# Altium PCB resistive.PcbDoc
Units mm, origin at the board's own origin, x right, y up, seen from the top; angles counter-clockwise.
Board outline 18 x 14 mm, 2 copper layers (Top Layer, Bottom Layer); 29 components, 21 nets, 74 pads, 21 vias.
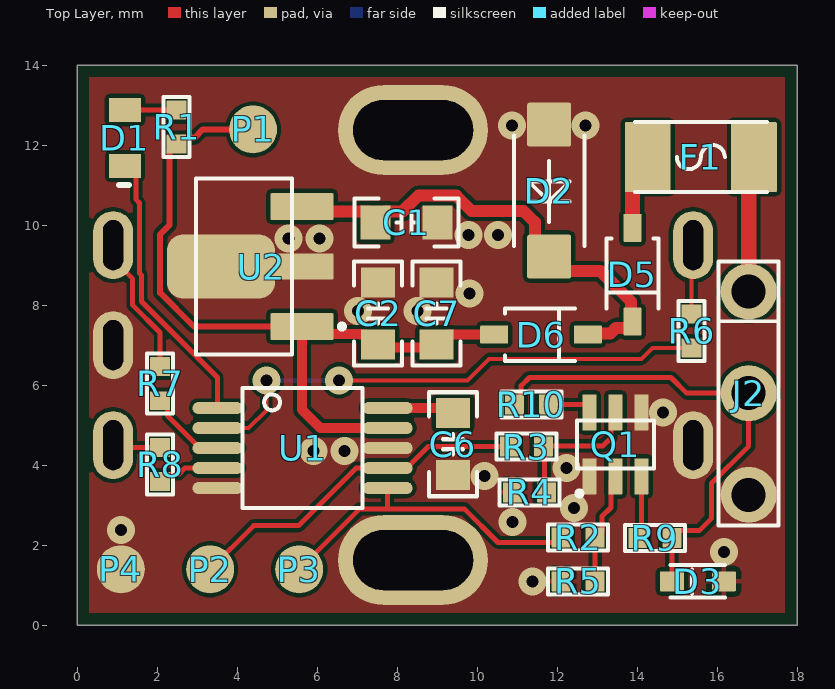
[diagram p0: Top Layer view]
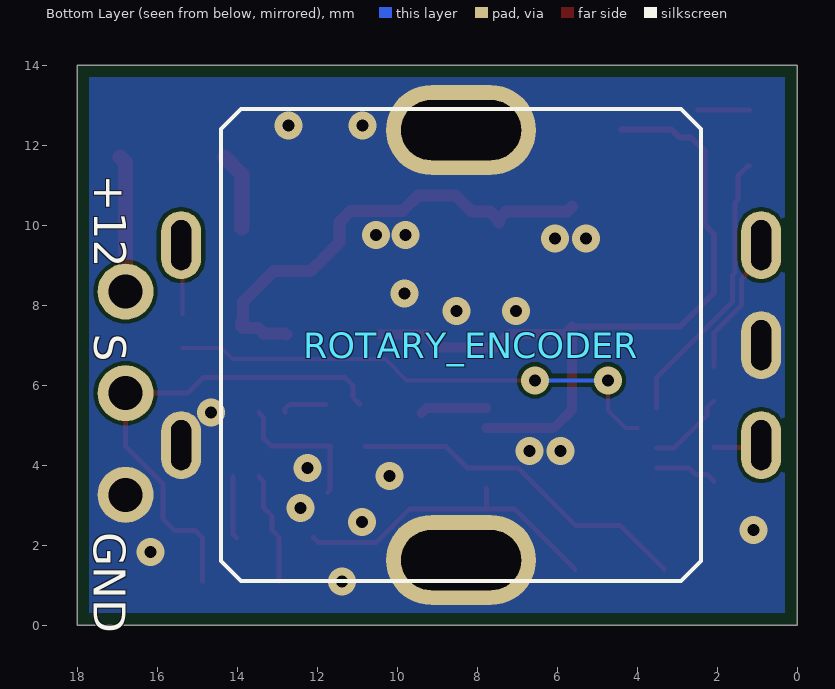
[diagram p1: Bottom Layer view, seen from below]
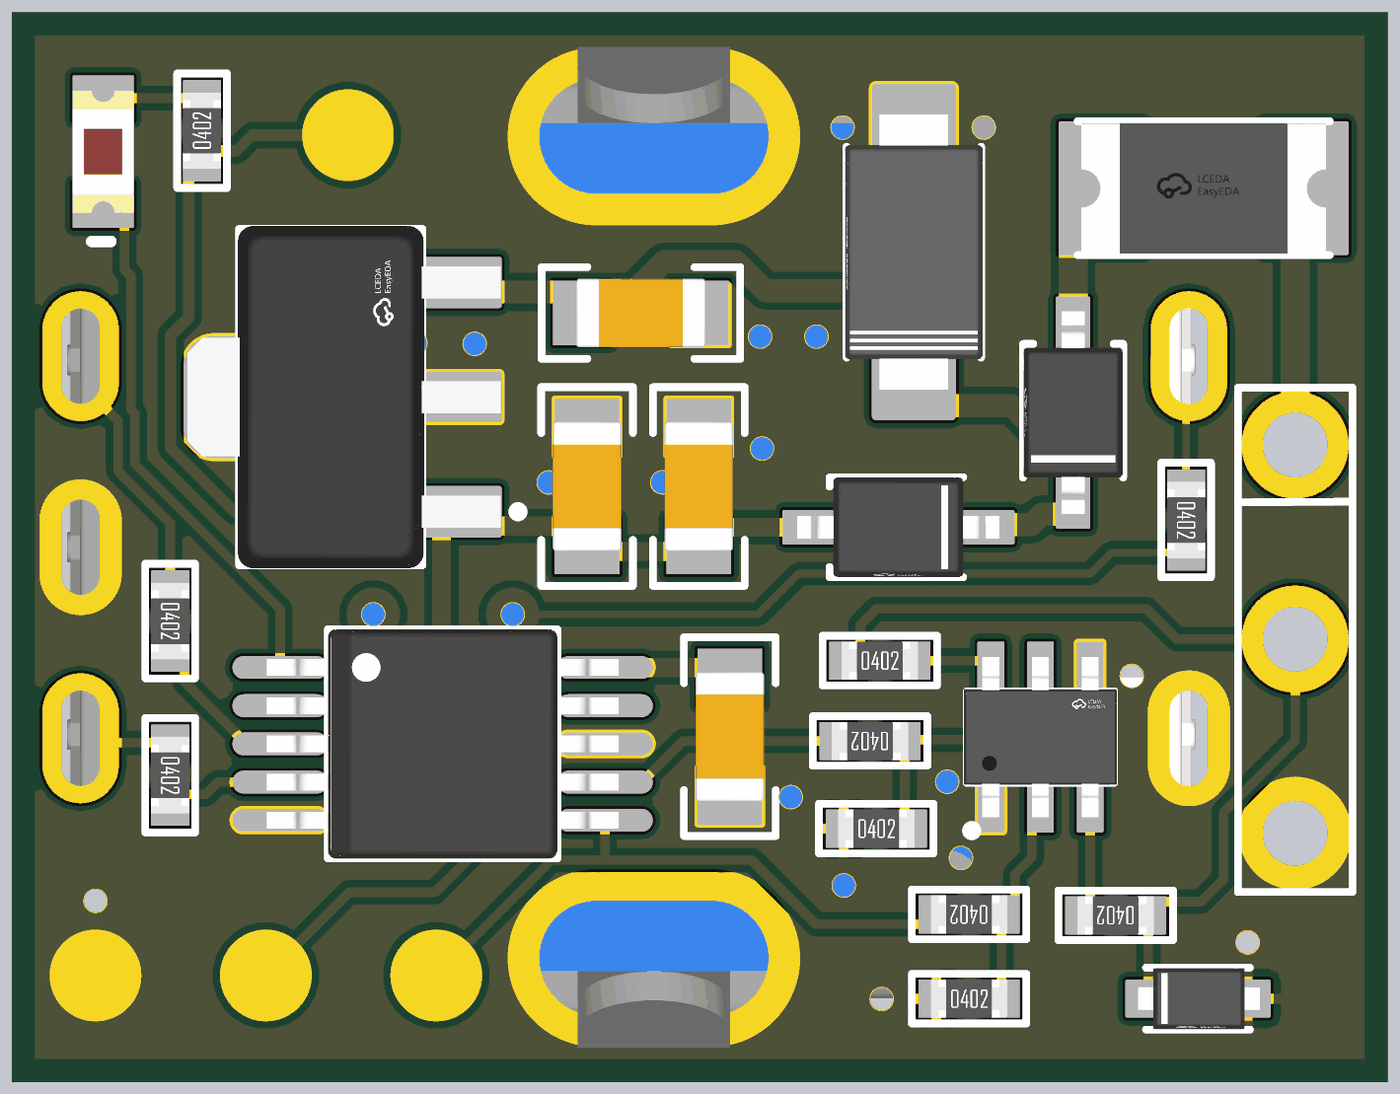
[diagram p2: 3D render of the assembled board from above, using the file's embedded part models]

## Layer stack, top to bottom
Top Solder: solder mask 0.0102, Solder Resist, Dk 3.5
Top Layer: signal copper 0.0356
Dielectric 1: dielectric 0.32, FR-4, Dk 4.8
Bottom Layer: signal copper 0.0356
Bottom Solder: solder mask 0.0102, Solder Resist, Dk 3.5

## Board outline
0,0 0,14 18,14 18,0

## Design rules (kind name [scope] priority, off if disabled: settings)
BoardOutlineClearance [OnCopper] p1: gap=0.3 ignorepadtopadclearanceinfootprint=FALSE except(0: Arc-SplitContinuation Track-SplitContinuation SMDPad-SplitContinuation THPad-SplitContinuation Via-SplitContinuation Fill-SplitContinuation Poly-SplitContinuation Region-SplitContinuation Text-SplitContinuation)
Clearance [All] p1: gap=0.095 ignorepadtopadclearanceinfootprint=FALSE
ComponentClearance [Not OnLayer('Enclosure') vs Not OnLayer('Enclosure')] p1: gap=0.125 collisioncheckmode=3 verticalgap=0.254 showdistances=TRUE
DiffPairsRouting [InDifferentialPairClass('USB')] p1: maxlimit=0.127 minlimit=0.127 mostfreqgap=0.127 toplayer_minwidth=0.242 toplayer_maxwidth=0.242 toplayer_prefwidth=0.242 bottomlayer_minwidth=0.242 bottomlayer_maxwidth=0.242 bottomlayer_prefwidth=0.242 impedanceprofiledriven=TRUE impedanceprofileid={CD0D31D9-B0F9-43E5-BBF6-D407F49B71FA} maxuncoupledlength=14
HoleSize [All] p1: absolutevalues=TRUE maxlimit=5 minlimit=0.2 maxpercent=80.000 minpercent=20.000
MinimumSolderMaskSliver [All] p1: minsoldermaskwidth=0
NetAntennae [Not InComponentClass('KEYPAD')] p1: netantennaetolerance=0
PolygonConnect PolygonConnect_GND [All vs IsVia Or (IsPad And ((AsMM(PadXSize_AllLayers) * AsMM(PadYSize_AllLayers)) >= 0.31))] p1: connectstyle=Direct reliefconductorwidth=0.254 reliefentries=4 polygonreliefangle="90 Angle" airgapwidth=0.254
PolygonConnect PolygonConnect_Normal [All] p2: connectstyle=Relief reliefconductorwidth=0.127 reliefentries=4 polygonreliefangle="90 Angle" airgapwidth=0.127
RoutingVias [All] p1: holewidth=0.711 width=1.27 viastyle="Through Hole" minholewidth=0.711 minwidth=1.27 maxholewidth=0.711 maxwidth=1.27 useviatemplates=TRUE viatemplateguid#1={04ACC37B-7A8D-4E3D-BE00-B1F644DBFDDB} viatemplateguid#2={0474D94F-0ABB-4B82-A31C-A553258D154D} viatemplateguid#3={78088A16-755C-4FA5-86BD-2362A4E1C389} viatemplatename#1=GND_VIA viatemplatename#2=PWR_VIA viatemplatename#3=SIGNAL_VIA
SilkToSilkClearance [All] p1: silktosilkclearance=0
SilkToSolderMaskClearance [False] p1: minsilkscreentomaskgap=0 clearancetoexposedcopper=TRUE
SolderMaskExpansion SolderMaskExpansion_VIA [IsVia] p1: expansion=0.102 istentingtop=TRUE soldermaskfromhole=TRUE
SolderMaskExpansion [All] p2: expansion=0.038 istentingtop=FALSE
SupplyNets "Schematic Supply Nets_10" [InNet('12V')] p1: voltage=0.000
SupplyNets "Schematic Supply Nets_2" [InNet('5V')] p2: voltage=0.000
SupplyNets "Schematic Supply Nets" [InNet('3v3')] p3: voltage=0.000
SupplyNets "Schematic Supply Nets_4" [InNet('GND')] p4: voltage=0.000
Width Width_PWR_LOW [InNetClass('PWR_LOW')] p1: maxlimit=2 minlimit=0.089 preferedwidth=0.3 minimp=50.000000 maximp=50.000000 favimp=50.000000
Width Width_PWR_MED [InNetClass('PWR_MED')] p2: maxlimit=3 minlimit=0.089 preferedwidth=0.5 minimp=50.000000 maximp=50.000000 favimp=50.000000
Width Width_PWR_SW [InNetClass('PWR_SW')] p3: maxlimit=5 minlimit=0.25 preferedwidth=1 minimp=50.000000 maximp=50.000000 favimp=50.000000
Width Width_PWR_HIGH [InNetClass('PWR_HIGH')] p4: maxlimit=5 minlimit=0.089 preferedwidth=1.5 bottomlayer_prefwidth=1.5 minimp=50.000000 maximp=50.000000 favimp=50.000000
Width Width_default [All] p5: maxlimit=1 minlimit=0.089 preferedwidth=0.15 minimp=50.000000 maximp=50.000000 favimp=50.000000
23 further rules are at their usual default settings.

## Components (designator, comment, footprint, x,y, rotation, side; value= is the part's Value field where it differs from the comment)
C1 "1u" MLCC_0603 8.23,10.066 r180 top
C2 "100n" MLCC_0603 7.526,7.796 r270 top
C6 "1u" MLCC_0603 9.394,4.522 r90 top
C7 "10u" MLCC_0603 8.987,7.796 r270 top
D1 "Red" LED0603 1.195,12.176 r90 top
D2 "SMF18A" SOD-123FL 11.801,10.862 r90 top
D3 "PESD24VS1UB" SOD-523 15.518,1.094 r0 top
D5 "1N4148WS" SOD-323 13.884,8.761 r90 top
D6 "1N4148WS" SOD-323 11.598,7.262 r180 top
F1 "100mA" F1206 15.593,11.698 r0 top
J2 "CON_X3" CON_X3 16.79,8.338 r270 top
P1 "PAD" PAD 4.398,12.392 r0 top
P2 "PAD" PAD 3.324,1.397 r0 top
P3 "PAD" PAD 5.553,1.397 r0 top
P4 "PAD" PAD 1.095,1.397 r0 top
Q1 "2N7002DW" SOT-363 13.458,4.517 r0 top
R1 "1k" R0402 2.489,12.45 r90 top
R2 "22r" R0402 12.524,2.196 r180 top
R3 "22r" R0402 11.228,4.465 r180 top
R4 "47k" R0402 11.31,3.319 r0 top
R5 "47k" R0402 12.524,1.094 r0 top
R6 "220r" R0402 15.363,7.356 r270 top
R7 "220r" R0402 2.072,6.035 r270 top
R8 "220r" R0402 2.072,4.017 r270 top
R9 "1k" R0402 14.442,2.184 r180 top
R10 "1k5" R0402 11.355,5.517 r0 top
ROTARY_ENCODER "ROTARY_ENCODER" ENCODER 8.4,7 r90 bottom
U1 "CH554E" MSOP10 5.636,4.427 r270 top
U2 "78L05_SOT89" SOT-89-3 4.172,8.965 r0 top

## Footprints (in the part's own frame and the unit in brackets; to place one, negate y for a bottom-side part, rotate by r counter-clockwise, add the part's x,y. Pads: shape width x height; smd on the part's side, far side on the other; paste and mask are expansions set on the pad)
CON_X3 [mm]
  round 1.4 hole 0.85: 1(0,0) 2(2.54,0) 3(5.08,0)
  silkscreen extent -0.75,-0.75 5.85,0.75
ENCODER [mm] "Rotary encoder"
  oval 1.7x1 hole 0.5 slot 1.25 at 0 deg: 1(-2.5,-7.5) 2(0,-7.5) 3(2.5,-7.5) 4(-2.5,7) 5(2.5,7)
  rrect100% 2.25x3.75 hole 1.5 slot 3 at 90 deg: M(-5.375,0)
  oval 2.25x3.75 hole 1.5 slot 3 at 90 deg: M(5.375,0)
  silkscreen extent -5.9,-6 5.9,6, body extent -6.55,-7.68 6.55,7.08, height 21.18
F1206 [mm] "Littelfuse 468 series 1206 fuse"
  rrect5% 1.14x1.75 smd: 1(-1.33,0) 2(1.33,0)
  silkscreen extent -1.65,-0.87 1.65,0.87, body extent -1.6,-0.85 1.6,0.85, height 0.6
LED0603 [mm] "Chip LED 0603 (1608 metric), pad 1 cathode (left)"
  rrect5% 0.6x0.8 smd: A(0.7,0) K(-0.7,0)
  silkscreen extent -1.17,-0.1 -1.17,0.15, body extent -0.8,-0.4 0.8,0.4, height 0.28
MLCC_0603 [mm] "MLCC 0603"
  rrect1% 0.75x0.85 smd: 1(-0.775,0) 2(0.775,0)
  silkscreen extent -1.3,-0.6 1.3,0.6, body extent -0.85,-0.45 0.85,0.45, height 0.7
MSOP10 [mm] "MSOP10 3x3 x 0.5"
  oval 0.3x1.25 smd: 1(-1,-2.125) 2(-0.5,-2.125) 3(0,-2.125) 4(0.5,-2.125) 5(1,-2.125) 6(1,2.125) 7(0.5,2.125) 8(0,2.125) 9(-0.5,2.125) 10(-1,2.125)
  silkscreen extent -1.5,-1.5 1.5,1.5, body extent -1.5,-2.3 1.5,2.3, height 1
PAD [mm]
  round 1.2 smd paste-2539.97 mask+0: 1(0,0)
R0402 [mm] "Chip resistor 0402 (1005 metric)"
  rrect5% 0.473x0.5 smd: 1(-0.426,0) 2(0.426,0)
  silkscreen extent -0.75,-0.33 0.75,0.33, body extent -0.5,-0.25 0.5,0.25, height 0.35
SOD-123FL [mm] "SOD-123FL diode/TVS, pad 1 = cathode (left), pad 2 = anode"
  rrect10% 1.1x1.1 smd: A(1.65,0) K(-1.65,0)
  silkscreen extent -1.38,-0.88 1.38,0.88, body extent -1.8,-0.9 1.8,0.9, height 0.9
SOD-323 [mm] "SOD-323 diode, pads K (cathode, left) / A"
  rrect10% 0.7x0.45 smd: A(1.17,0) K(-1.17,0)
  silkscreen extent -0.85,-0.65 0.9,0.65, body extent -1.33,-0.65 1.33,0.65, height 0.95
SOD-523 [mm] "SOD-523 (SC-79) diode, pads K (cathode, left) / A"
  rrect10% 0.6x0.5 smd: A(0.65,0) K(-0.65,0)
  silkscreen extent -0.68,-0.4 0.68,0.4, body extent -0.79,-0.4 0.81,0.4, height 0.7
SOT-89-3 [mm] "SOT-89-3, 1=OUT 2=GND(tab) 3=IN for 78L05 C20628877"
  rrect10% 1.575x0.672 smd: 1(1.45,-1.5) 3(1.45,1.5)
  rrect50% 2.7x1.6 smd: 2(-0.575,0)
  rrect10% 1.575x0.66 smd: 2(1.45,0)
  silkscreen extent -1.2,-2.2 2.5,2.2, body extent -1.88,-2.24 2.22,2.24, height 1.5
SOT-363 [mm] "SOT-363 (SC-70-6), pin 1 bottom-left, 0.65mm pitch"
  rrect10% 0.35x0.9 smd: 1(-0.65,-0.8) 2(0,-0.8) 3(0.65,-0.8) 4(0.65,0.8) 5(0,0.8) 6(-0.65,0.8)
  silkscreen extent -0.97,-1.27 0.96,0.6, body extent -1,-1.05 1,1.05, height 0.95

## Part data
C1 C6: library part CAP_0603_1U_50V, "MLCC", JLCPCB=C15849
C2: library part CAP_0603_100N_50V, "MLCC", JLCPCB=C14663
C7: library part CAP_0603_10U_10V, "MLCC", JLCPCB=C19702
D1: library part LED_0603_RED, "LED", JLCPCB=C2286
D2: "TVS Diode", JLCPCB=C19077512
D3: "TVS Diode", JLCPCB=C85382
D5 D6: "Silicon Diode", JLCPCB=C2128
F1: library part PTC_1206_100MA, "FUSE", JLCPCB=C70065, Part=nSMD010
Q1: "Dual N-Channel MOSFET", JLCPCB=C5190214, Part=2N7002DW
R1 R9: library part RES_0402_1K, "Resistor", JLCPCB=C11702
R2 R3: library part RES_0402_22R, "Resistor", JLCPCB=C25092
R4 R5: library part RES_0402_47K, "Resistor", JLCPCB=C25792
R6 R7 R8: library part RES_0402_220R, "Resistor", JLCPCB=C25091
R10: library part RES_0402_1K5, "Resistor", JLCPCB=C25867
ROTARY_ENCODER: "Rotary Encoder"
U1: JLCPCB=C111293
U2: "5V LDO", JLCPCB=C20628877, Part=AS78L05RTR-E1

## Via types
v1: diameter 0.7, hole 0.3, Top Layer to Bottom Layer, tented both sides, 21 vias

## Nets (pads, with @x,y where several pads share a name; then routed paths per layer and width w, separated by ;. In a path a pad name is that pad's centre, name@x,y a point inside that pad or via, vN(x,y) a via of type N, cw(c..) or ccw(c..) an arc to the next point about the centre after c; other vN are vias at no path point)
3v3: C6.2 U1.10 | length 1.7
  Top Layer w0.25: U1.10 9.264,5.427 C6.2
5V: C2.2 C7.2 D6.A P1.1 R1.1 U1.9 U2.1 | length 19.4
  Top Layer w0.15: P1.1 3.142,12.392 2.936,12.186 2.65,12.186 R1.1 2.475,12.024 2.314,11.863 2.314,10.009 2.077,9.772 2.077,8.305 2.917,7.465 U2.1
  Top Layer w0.25: U1.9 6.08,4.927 5.622,5.385 U2.1 5.809,7.278 7.079,7.278 7.087,7.271 7.226,7.271 7.526,6.971 7.526,6.944 8.987,6.944 8.987,6.962 9.287,7.262 D6.A
12V: F1.2 J2.1 | length 3.7
  Top Layer w0.381: J2.1@16.79,8.084 16.79,11.565 F1.2
12V_F: D5.A F1.1 | length 1.9
  Top Layer w0.381: D5.A 13.884,11.269 F1.1@14.314,11.698
12V_S: C1.2 D2.K D5.K D6.K U2.3 | length 11.9
  Top Layer w0.3: U2.3 5.747,10.339 7.27,10.339 C1.2@7.455,10.155 ; C1.2 7.455,10.116 7.68,10.341 8.135,10.341 8.53,10.736 9.479,10.736 9.857,10.357 11.157,10.357 11.442,10.072 11.442,9.571 D2.K 12.161,8.852 13.084,8.852 13.85,8.086 13.85,7.626 D5.K 13.884,7.466 13.85,7.432 13.472,7.432 13.337,7.297 12.803,7.297 D6.K
BTN: R6.2 U1.2 | length 12.6
  Top Layer w0.1: U1.2@3.986,4.927 4.289,4.927 4.729,5.367 v1(4.729,6.121) ; v1(6.553,6.121) 9.764,6.121 10.296,6.654 14.111,6.654 14.387,6.93 R6.2
  Bottom Layer w0.1: v1(4.729,6.121) v1(6.553,6.121)
DA: Q1.6 R10.2 | length 1.2
  Top Layer w0.125: R10.2 12.695,5.517 12.808,5.404 Q1.6
DB: Q1.3 R9.2 | length 1.6
  Top Layer w0.125: R9.2 14.108,2.276 Q1.3
GA: Q1.2 R2.1 R5.2 | length 2.8
  Top Layer w0.125: R5.2 R2.1 13.124,2.37 13.124,2.72 13.345,2.941 13.345,3.604 Q1.2
GB: Q1.5 R3.1 R4.2 | length 3.6
  Top Layer w0.125: R4.2 11.681,3.373 11.681,4.438 R3.1 11.672,4.482 13.149,4.482 13.345,4.678 13.345,5.205 Q1.5
GND: C1.1 C2.1 C6.1 C7.1 D2.A D3.A J2.3 P4.1 Q1.1 Q1.4 R4.1 R5.1 ROTARY_ENCODER.2 ROTARY_ENCODER.4 ROTARY_ENCODER.M U1.5 U1.8 U2.2
  other v1: 11.38,1.088 16.168,1.83 1.095,2.373 10.884,2.575 12.417,2.934 10.19,3.731 12.238,3.932 6.687,4.348 5.913,4.357 14.652,5.317 7.025,7.848 8.511,7.85 9.815,8.291 5.28,9.671 6.055,9.661 9.789,9.756 10.527,9.756 10.869,12.491 12.716,12.491
LED: D1.K U1.1 | length 7
  Top Layer w0.125: D1.K 1.237,11.476 1.475,11.239 1.475,10.636 1.558,10.554 1.558,8.8 1.61,8.748 1.61,8.09 3.511,6.189 U1.1
LED_A: D1.A R1.2 | length 1.3
  Top Layer w0.125: D1.A R1.2
P36: P3.1 R2.2 U1.6 | length 8.1
  Top Layer w0.125: P3.1 7.064,2.908 7.761,2.908 9.681,2.908 10.521,2.067 11.969,2.067 R2.2 ; 7.761,2.906 U1.6
P37: P2.1 R3.2 U1.7 | length 8.7
  Top Layer w0.125: P2.1 4.414,2.487 5.535,2.487 6.975,3.927 U1.7 8.242,3.927 8.78,4.465 R3.2
RA_IN: R8.2 U1.4 | length 1.6
  Top Layer w0.125: R8.2 2.246,3.765 2.533,3.765 2.694,3.927 U1.4
RB_IN: R7.2 U1.3 | length 2
  Top Layer w0.125: R7.2 2.085,5.609 2.259,5.435 2.259,5.237 3.069,4.427 U1.3
RTA: R8.1 ROTARY_ENCODER.1 | length 1.2
  Top Layer w0.125: ROTARY_ENCODER.1@0.863,4.5 0.919,4.443 R8.1
RTB: R7.1 ROTARY_ENCODER.3 | length 3.5
  Top Layer w0.125: ROTARY_ENCODER.3@0.863,9.5 0.863,9.184 1.39,8.657 1.39,7.999 2.072,7.317 R7.1
SWB: R6.1 ROTARY_ENCODER.5 | length 1.7
  Top Layer w0.1: R6.1 ROTARY_ENCODER.5@15.363,9.5
SWC: D3.K J2.2 R9.1 R10.1 | length 12.3
  Top Layer w0.125: R10.1 11.101,5.688 11.101,5.985 11.308,6.192 14.845,6.192 15.239,5.798 J2.2 16.79,4.474 15.856,3.54 15.856,2.662 15.555,2.362 15.042,2.362 14.868,2.188 R9.1 D3.K

## Polygon pours and split planes (outlines as drawn)
GND on Top Layer "NEUTRAL_BOTTOM" (solid, remove dead copper, pour order 0): -2,14 -2,0 18,0 18,14
GND on Bottom Layer "NEUTRAL_BOTTOM" (solid, remove dead copper, pour order 1): -2,14 -2,0 18,0 18,14

## Silkscreen, mask and mechanical layers (free items; w line width, h text height)
Bottom Overlay:
  text "+12" at 17.569,11.256 h0.8 r90
  text "S" at 17.569,7.289 h0.8 r90
  text "GND" at 17.587,2.317 h0.8 r90
Mechanical 1:
  the board outline again, w0.1